# Altium PCB updated_pcb_file.PcbDoc (part 2 of 5)
Units mil, origin at the board's own origin, x right, y up, seen from the top; angles counter-clockwise.
Board outline 3385.83 x 2125.98 mil, 4 copper layers (L1 (TOP), L2 (GND), L3 (PWR), L4 (BOTTOM)), stack 38.228 mil thick; 154 components, 143 nets, 726 pads, 326 vias.
Unrouted connection lines stored in the file: 46.
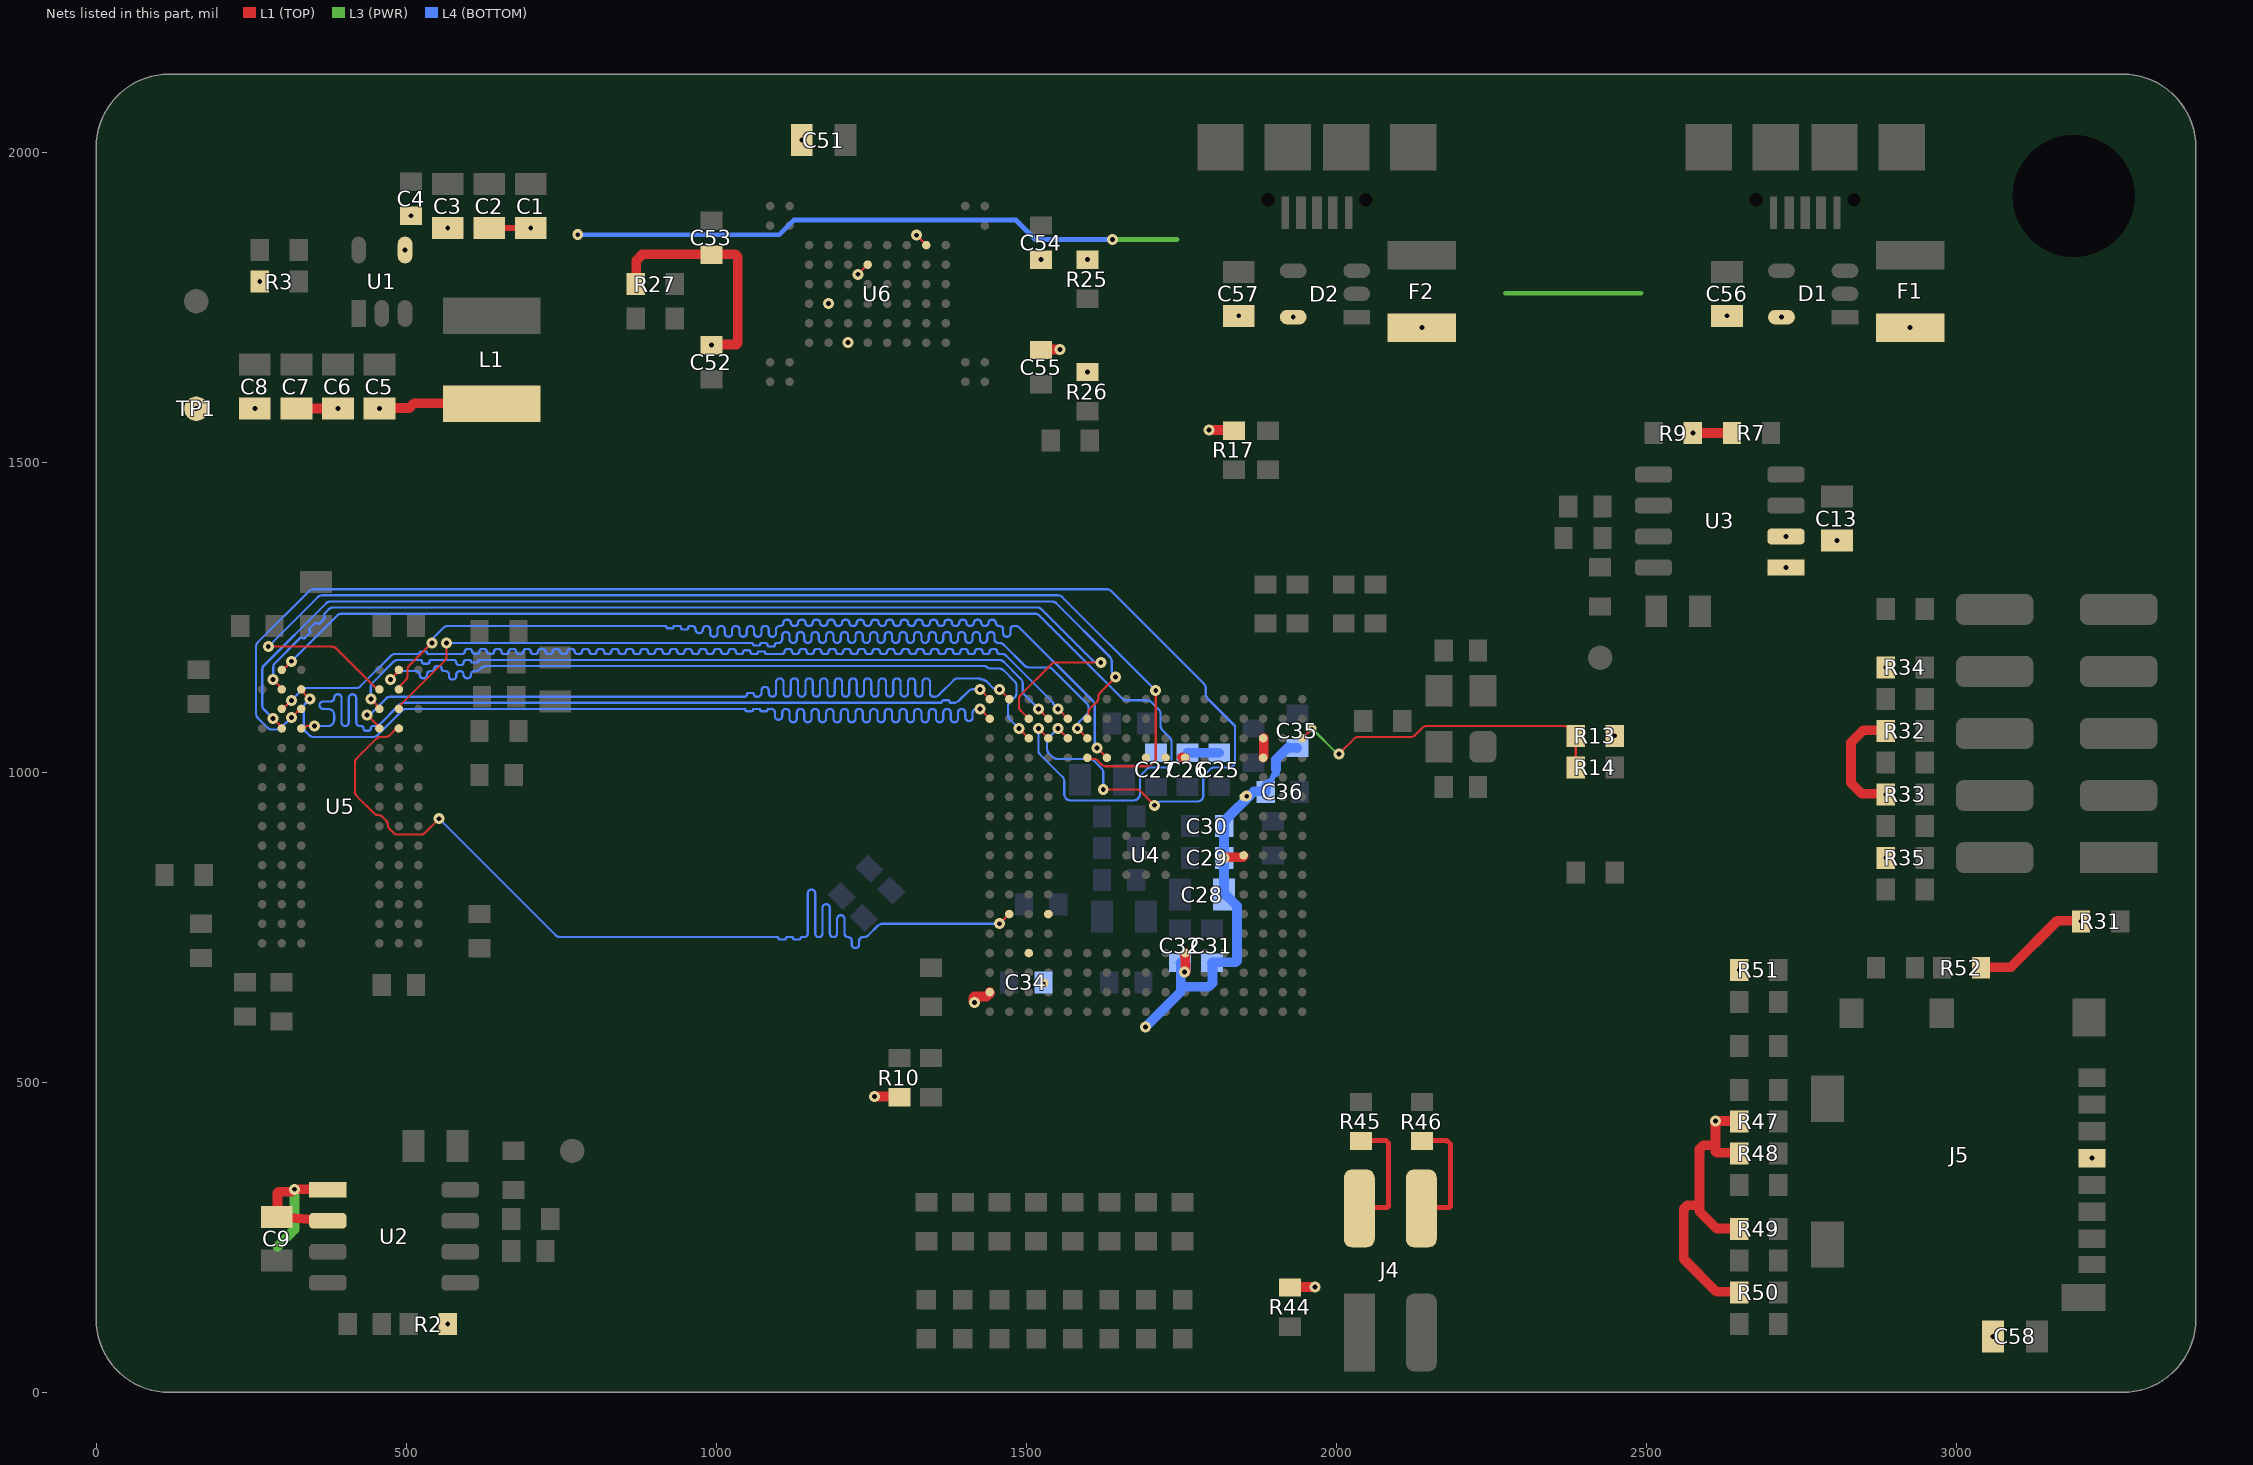
[diagram p4: the nets of this part, all layers, seen from the top]

## Via types
v1: diameter 17.72, hole 7.87, L1 (TOP) to L4 (BOTTOM), 310 vias
v2: diameter 13.78, hole 3.94, L1 (TOP) to L3 (PWR), 7 vias
v3: diameter 17.72, hole 7.87, L1 (TOP) to L3 (PWR), 5 vias
v4: diameter 13.78, hole 3.94, L2 (GND) to L4 (BOTTOM), 3 vias
v5: diameter 13.78, hole 3.94, L3 (PWR) to L4 (BOTTOM), 1 vias

## Nets (pads, with @x,y where several pads share a name; then routed paths per layer and width w, separated by ;. In a path a pad name is that pad's centre, name@x,y a point inside that pad or via, vN(x,y) a via of type N, cw(c..) or ccw(c..) an arc to the next point about the centre after c; other vN are vias at no path point) (continued)
+3V3: C5.2 C6.2 C7.2 C8.2 C9.2 C13.2 C25.2 C26.2 C27.2 C28.2 C29.2 C30.2 C31.2 C32.2 C34.2 C35.2 C36.2 C51.2 C52.2 C53.2 C54.2 C55.2 C58.2 J5.4 L1.2 R2.2 R3.1 R7.2 R9.2 R10.2 R13.2 R17.2 R25.2 R26.2 R27.2 R31.2 R32.2 R33.2 R34.2 R35.2 R44.2 R47.2 R48.2 R49.2 R50.2 R51.2 R52.2 TP1.1 U2.1 U2.2 U3.1 U3.2 U4.A2 U4.C4 U4.D6 U4.J14 U4.K14 U4.L3 U4.L4 U4.L14 U4.P9 U4.P12 U4.R14 U4.R15 U6.D3 U6.G4 U6.H8 U6.J6 | length 3043.9
  L1 (TOP) w3.54: v1(1228.35,1803.15) U6.G4@1244.09,1818.9 ; v1(1322.83,1866.14) U6.D3@1338.58,1850.39
  L1 (TOP) w11.81: U4.P9@1850.39,866.14 U4.P9@1851.42,865.02 ; U4.P12@1850.39,960.63 v1(1855.36,961.47)
  L1 (TOP) w13.14: U4.P9@1849.45,863.05 U4.P9@1851.42,865.02
  L1 (TOP) w13.78: U4.L14@1751.03,1024.46 U4.L14@1755.91,1023.62 ; U4.L3@1755.91,677.17 U4.L3@1756.93,678.01 ; U4.R15@1881.89,1055.12 U4.R15@1882.92,1055.96
  L1 (TOP) w14.47: U4.P9@1847.48,863.05 U4.P9@1849.45,863.05
  L1 (TOP) w15: U4.R14@1881.89,1023.62 U4.R14@1882.92,1026.43
  L1 (TOP) w15.24: U4.R15@1882.92,1053.99 U4.R15@1882.92,1055.96
  L1 (TOP) w15.57: U4.P9@1845.52,863.05 U4.P9@1847.48,863.05
  L1 (TOP) w15.75: C7.2@322.83,1586.61 v1(389.76,1586.61) ; U2.2@373.54,276.97 291.34,283.46 292.37,286.28 292.37,321.71 294.33,323.68 315.99,323.68 v1(319.93,327.61) 373.07,327.61 U2.1@373.54,326.97 ; v1(456.69,1586.61) 457.72,1587.46 504.96,1587.46 512.84,1595.33 636.85,1595.33 L1.2@637.8,1594.49 ; R27.2@870.08,1787.4 871.11,1790.21 871.11,1825.65 880.95,1835.49 993.15,1835.49 992.13,1834.65 995.12,1835.49 1030.56,1835.49 1034.49,1831.55 1034.49,1691.79 1032.52,1689.82 993.15,1689.82 v1(992.13,1688.98) ; v1(1254.96,477.22) 1294.33,477.22 R10.2@1295.28,476.38 ; v1(1416.38,628.8) 1414.41,630.76 1414.41,636.67 1416.38,638.64 1436.07,638.64 1441.97,644.54 U4.A2@1440.94,645.67 ; C55.2@1523.62,1681.1 1526.62,1681.94 v1(1554.18,1681.94) ; U4.L14@1751.03,1024.46 U4.L14@1755.91,1023.62 ; v1(1754.96,678.01) U4.L3@1755.91,677.17 ; U4.L4@1755.91,708.66 U4.L3@1756.93,678.01 ; v1(1794.33,1552.02) 1833.7,1552.02 R17.2@1834.65,1551.18 ; v1(1818.9,862.2) 1821.89,863.05 U4.P9@1845.52,863.05 ; U4.R14@1882.92,1026.43 U4.R15@1882.92,1053.99 ; R44.2@1925.2,169.29 1928.19,170.13 v1(1965.59,170.13) ; v1(2574.8,1547.24) R7.2@2637.8,1547.24 ; R50.2@2649.61,161.42 2648.67,162.26 2613.23,162.26 2560.08,215.41 2560.08,296.12 2565.99,302.02 2585.67,302.02 ; R49.2@2649.61,263.78 2648.67,264.62 2613.23,264.62 2585.67,292.18 2585.67,302.02 ; R48.2@2649.61,385.83 2648.67,386.67 2613.23,386.67 2611.26,388.64 2611.26,398.48 ; R47.2@2649.61,437.01 2648.67,437.85 v1(2611.26,437.85) 2611.26,398.48 ; v1(2885.83,964.57) 2886.85,965.41 2847.48,965.41 2829.77,983.13 2829.77,1048.09 2849.45,1067.77 2884.89,1067.77 R32.2@2885.83,1066.93 ; R52.2@3039.37,685.04 3042.37,685.88 3087.64,685.88 3162.44,760.69 3201.82,760.69 v1(3200.79,759.84) ; 2585.67,302.02 2585.67,392.57 2591.58,398.48 2611.26,398.48
  L3 (PWR) w15.75: 292.37,235.09 319.93,262.65 v1(319.93,327.61)
  L4 (BOTTOM) w7.87: 1894.73,987.06 1896.7,989.03 1896.7,992.97 1898.67,994.94
  L4 (BOTTOM) w9.43: C36.2@1892.76,985.09 1894.73,987.06 ; 1898.67,994.94 1900.63,996.91
  L4 (BOTTOM) w10.99: C36.2@1890.79,983.13 C36.2@1892.76,985.09 ; 1900.63,996.91 1902.6,998.87
  L4 (BOTTOM) w12.32: 1902.6,998.87 1902.6,1000.84
  L4 (BOTTOM) w12.55: C36.2@1888.82,981.16 C36.2@1890.79,983.13
  L4 (BOTTOM) w13.43: 1902.6,1000.84 1902.6,1002.81
  L4 (BOTTOM) w14.11: C36.2@1886.85,979.19 C36.2@1888.82,981.16
  L4 (BOTTOM) w14.53: 1902.6,1002.81 1902.6,1004.78
  L4 (BOTTOM) w15.44: C36.2@1886.85,977.22 C36.2@1886.85,979.19
  L4 (BOTTOM) w15.63: 1902.6,1004.78 1902.6,1006.75
  L4 (BOTTOM) w15.75: v1(1691.97,589.43) 1749.06,646.51 1749.06,691.79 C32.2@1748.03,692.91 ; 1749.06,654.39 1794.33,654.39 1800.24,660.29 1800.24,691.79 1799.21,692.91 1800.24,693.76 1837.64,693.76 1839.61,695.72 1839.61,784.31 1821.89,802.02 1818.9,803.15 1818.9,913.39 1819.93,922.1 1867.17,969.35 1884.89,969.35 1885.83,968.5 C36.2@1886.85,977.22 ; C26.2@1759.84,1031.5 C25.2@1811.02,1031.5 ; 1902.6,1006.75 1902.6,1020.53 1922.29,1040.21 C35.2@1937.01,1039.37
  other v1: 3059.06,90.55 566.93,110.24 3218.41,377.95 2649.61,681.1 2885.83,862.2 2448.82,1059.06 2885.83,1169.29 2724.88,1330.51 2807.09,1374.02 2724.88,1380.51 161.42,1586.61 255.91,1586.61 1598.43,1645.67 1212.6,1692.91 1181.1,1755.91 263.78,1791.34 1523.62,1826.77 1598.43,1826.77 1137.8,2019.69
  other v5: 1528.59,660.29
+5V_VBUS: C1.2 C2.2 C3.2 C4.2 C56.2 C57.2 D1.5 D2.5 F1.2 F2.2 U1.4 | length 1274.8
  L1 (TOP) w9.84: C2.2@633.86,1877.95 v1(700.79,1877.95)
  L3 (PWR) w7.87: v1(1638.82,1859.11) 1743.15,1859.11 ; 2272.68,1772.5 2491.19,1772.5
  L4 (BOTTOM) w7.87: v1(776.62,1866.98) 1101.42,1866.98 1125.04,1890.61 1483.31,1890.61 1514.81,1859.11 v1(1638.82,1859.11)
  other v1: 2137.8,1717.13 2925.2,1717.13 1930.32,1734.25 2717.72,1734.25 1842.52,1736.22 2629.92,1736.22 498.03,1842.52 566.93,1877.95 507.87,1897.64
CPU_BMS: R13.1 R14.2 U4.U15 | length 539.5
  L1 (TOP) w3.54: U4.U15@1944.88,1055.12 v2(1960.63,1070.87) ; v1(2003.94,1029.53) 2028.61,1054.2 cw(c2035.57,1047.24) 2035.57,1057.09 2119.94,1057.09 ccw(c2119.94,1066.93) 2126.9,1059.97 2138.85,1071.92 cw(c2145.81,1064.96) 2145.81,1074.8 2368.69,1074.8 cw(c2368.69,1071.44) 2371.06,1073.82 2372.05,1072.83 2385.83,1059.06 2385.83,1043.31 2385.83,1025.59 R14.2@2385.83,1007.87
  L3 (PWR) w3.54: v2(1960.63,1070.87) 2001.27,1030.22 ccw(c2002.95,1031.9) 2002.95,1029.53 v1(2003.94,1029.53)
DBG_UART_RX: J4.4 R46.1 | length 197.7
  L1 (TOP) w7.87: J4.4@2136.81,296.85 2138.82,298.09 2182.13,298.09 2184.1,300.06 2184.1,400.45 2178.19,406.35 2140.79,406.35 R46.1@2137.8,405.51
DBG_UART_TX: J4.2 R45.1 | length 196.4
  L1 (TOP) w7.87: J4.2@2036.81,296.85 2040.4,298.09 2081.74,298.09 2083.7,300.06 2083.7,402.42 2079.77,406.35 2042.37,406.35 R45.1@2039.37,405.51
DRAM_A0: U4.F16 U5.M8 | length 1677
  L1 (TOP) w3.54: v1(285.43,1086.61) 294.58,1077.47 cw(c292.9,1075.79) 295.27,1075.79 ccw(c297.65,1075.79) U5.M8@295.97,1074.11 ; U5.M8@295.97,1074.11 U5.M8@299.21,1070.87 ; U4.F16@1598.42,1086.61 1599.89,1091 ccw(c1590.55,1094.12) 1600.39,1094.12 1600.39,1096.46 cw(c1609.9,1096.46) 1603.18,1103.18 1613.26,1113.26 ccw(c1606.3,1120.22) 1616.14,1120.22 1616.14,1121.91 cw(c1625.98,1121.91) 1619.02,1128.87 v1(1643.7,1153.54)
  L4 (BOTTOM) w3.54: v1(285.43,1086.61) 270.6,1101.45 cw(c277.56,1108.41) 267.72,1108.41 267.72,1165.21 cw(c277.56,1165.21) 270.6,1172.17 371.13,1272.71 cw(c378.09,1265.75) 378.09,1275.59 1541.2,1275.59 cw(c1541.2,1265.75) 1548.16,1272.71 1634.91,1185.95 cw(c1627.95,1178.99) 1637.79,1178.99 1637.79,1163.53 ccw(c1647.64,1163.53) 1640.68,1156.57 v1(1643.7,1153.54)
DRAM_A1: U4.B17 U5.M3 | length 1667
  L1 (TOP) w3.54: v1(437.01,1092.52) 452.06,1077.47 cw(c450.38,1075.79) 452.76,1075.79 ccw(c455.13,1075.79) 453.45,1074.11 U5.M3@456.69,1070.87 ; v1(1456.69,1133.86) U4.B17@1472.44,1118.11
  L4 (BOTTOM) w3.54: v1(437.01,1092.52) 438.98,1092.52 ccw(c438.98,1097.27) 442.34,1093.91 467.59,1119.16 cw(c474.55,1112.2) 474.55,1122.05 1046.26,1122.05 ccw(c1046.26,1125) 1049.21,1125 cw(c1052.16,1125) 1052.16,1127.95 1058.07,1127.95 cw(c1058.07,1125) 1061.02,1125 ccw(c1063.98,1125) 1063.98,1122.05 1066.93,1122.05 ccw(c1066.93,1127.95) 1072.83,1127.95 1072.83,1131.89 cw(c1078.74,1131.89) 1078.74,1137.79 cw(c1078.74,1131.89) 1084.65,1131.89 1084.65,1127.95 ccw(c1090.55,1127.95) 1090.55,1122.05 ccw(c1090.55,1127.95) 1096.46,1127.95 1096.46,1145.67 cw(c1102.36,1145.67) 1102.36,1151.57 cw(c1102.36,1145.67) 1108.27,1145.67 1108.27,1127.95 ccw(c1114.17,1127.95) 1114.17,1122.05 ccw(c1114.17,1127.95) 1120.08,1127.95 1120.08,1145.67 cw(c1125.98,1145.67) 1125.98,1151.57 cw(c1125.98,1145.67) 1131.89,1145.67 1131.89,1127.95 ccw(c1137.79,1127.95) 1137.79,1122.05 ccw(c1137.79,1127.95) 1143.7,1127.95 1143.7,1145.67 cw(c1149.61,1145.67) 1149.61,1151.57 cw(c1149.61,1145.67) 1155.51,1145.67 1155.51,1127.95 ccw(c1161.42,1127.95) 1161.42,1122.05 ccw(c1161.42,1127.95) 1167.32,1127.95 1167.32,1145.67 cw(c1173.23,1145.67) 1173.23,1151.57 cw(c1173.23,1145.67) 1179.13,1145.67 1179.13,1127.95 ccw(c1185.04,1127.95) 1185.04,1122.05 ccw(c1185.04,1127.95) 1190.94,1127.95 1190.94,1145.67 cw(c1196.85,1145.67) 1196.85,1151.57 cw(c1196.85,1145.67) 1202.76,1145.67 1202.76,1127.95 ccw(c1208.66,1127.95) 1208.66,1122.05 ccw(c1208.66,1127.95) 1214.57,1127.95 1214.57,1145.67 cw(c1220.47,1145.67) 1220.47,1151.57 cw(c1220.47,1145.67) 1226.38,1145.67 1226.38,1127.95 ccw(c1232.28,1127.95) 1232.28,1122.05 ccw(c1232.28,1127.95) 1238.19,1127.95 1238.19,1145.67 cw(c1244.09,1145.67) 1244.09,1151.57 cw(c1244.09,1145.67) 1250,1145.67 1250,1127.95 ccw(c1255.9,1127.95) 1255.9,1122.05 ccw(c1255.9,1127.95) 1261.81,1127.95 1261.81,1145.67 cw(c1267.72,1145.67) 1267.72,1151.57 cw(c1267.72,1145.67) 1273.62,1145.67 1273.62,1127.95 ccw(c1279.53,1127.95) 1279.53,1122.05 ccw(c1279.53,1127.95) 1285.43,1127.95 1285.43,1145.67 cw(c1291.34,1145.67) 1291.34,1151.57 cw(c1291.34,1145.67) 1297.24,1145.67 1297.24,1127.95 ccw(c1303.15,1127.95) 1303.15,1122.05 ccw(c1303.15,1127.95) 1309.05,1127.95 1309.05,1145.67 cw(c1314.96,1145.67) 1314.96,1151.57 cw(c1314.96,1145.67) 1320.87,1145.67 1320.87,1127.95 ccw(c1326.77,1127.95) 1326.77,1122.05 ; 1326.77,1122.05 ccw(c1326.77,1127.95) 1332.68,1127.95 1332.68,1145.67 cw(c1338.58,1145.67) 1338.58,1151.57 cw(c1338.58,1145.67) 1344.49,1145.67 1344.49,1127.95 ccw(c1350.39,1127.95) 1350.39,1122.05 1352.22,1122.05 ccw(c1352.22,1131.89) 1359.18,1124.93 1382.94,1148.69 cw(c1389.9,1141.73) 1389.9,1151.57 1423.8,1151.57 cw(c1423.8,1148.21) 1426.18,1150.59 ccw(c1428.56,1152.97) 1428.56,1149.61 1429.71,1149.61 cw(c1429.71,1146.25) 1432.09,1148.62 1432.37,1148.33 ccw(c1434.05,1150.01) 1434.05,1147.64 cw(c1434.05,1145.26) 1435.73,1146.94 1446.03,1136.64 ccw(c1452.76,1143.36) 1452.76,1133.86 v1(1456.69,1133.86)
DRAM_A2: U4.A17 U5.M7 | length 1372.1
  L1 (TOP) w3.54: U5.M7@330.71,1070.87 335.29,1072.39 ccw(c333.43,1077.99) 337.6,1073.82 cw(c339.97,1071.44) 339.97,1074.8 v1(352.36,1074.8) ; v1(1425.2,1133.86) U4.A17@1440.94,1118.11
  L4 (BOTTOM) w3.54: v1(352.36,1074.8) 374.02,1074.8 ccw(c374.02,1084.65) 383.86,1084.65 383.86,1092.52 ccw(c374.02,1092.52) 374.02,1102.36 366.14,1102.36 cw(c366.14,1108.27) 360.24,1108.27 cw(c366.14,1108.27) 366.14,1114.17 377.95,1114.17 ccw(c377.95,1120.08) 383.86,1120.08 cw(c389.76,1120.08) 389.76,1125.98 cw(c389.76,1120.08) 395.67,1120.08 395.67,1080.71 ccw(c401.57,1080.71) 401.57,1074.8 ccw(c401.57,1080.71) 407.48,1080.71 407.48,1120.08 cw(c413.39,1120.08) 413.39,1125.98 cw(c413.39,1120.08) 419.29,1120.08 419.29,1080.71 ccw(c425.2,1080.71) 425.2,1074.8 427.16,1074.8 cw(c427.16,1070.87) 431.1,1070.87 ccw(c435.04,1070.87) 435.04,1066.93 438.98,1066.93 ccw(c438.98,1070.87) 442.91,1070.87 cw(c446.85,1070.87) 446.85,1074.8 450.65,1074.8 ccw(c450.65,1084.65) 457.61,1077.69 489.24,1109.32 cw(c496.2,1102.36) 496.2,1112.2 1362.2,1112.2 ccw(c1362.2,1114.17) 1364.17,1114.17 cw(c1366.14,1114.17) 1366.14,1116.14 1374.02,1116.14 cw(c1374.02,1114.17) 1375.98,1114.17 ccw(c1377.95,1114.17) 1377.95,1112.2 1383.72,1112.2 ccw(c1383.72,1122.05) 1390.68,1115.09 1406.57,1130.98 cw(c1413.53,1124.02) 1413.53,1133.86 v1(1425.2,1133.86)
DRAM_A3: U4.F15 U5.N2 | length 1669.2
  L1 (TOP) w3.54: U5.N2@488.19,1102.36 489.42,1106.06 cw(c498.76,1102.95) 491.8,1109.91 562.08,1180.19 ccw(c555.12,1187.15) 564.96,1187.15 v1(564.96,1208.66) ; v1(1582.68,1070.87) U4.F15@1598.42,1055.12
  L4 (BOTTOM) w3.54: v1(564.96,1208.66) 1057.09,1208.66 cw(c1057.09,1206.69) 1059.05,1206.69 ccw(c1061.02,1206.69) 1061.02,1204.72 1068.9,1204.72 ccw(c1068.9,1206.69) 1070.87,1206.69 cw(c1072.83,1206.69) 1072.83,1208.66 1079.72,1208.66 cw(c1079.72,1205.71) 1082.68,1205.71 ccw(c1085.63,1205.71) 1085.63,1202.76 1091.53,1202.76 ccw(c1091.53,1205.71) 1094.49,1205.71 cw(c1097.44,1205.71) 1097.44,1208.66 1100.39,1208.66 ccw(c1100.39,1214.57) 1106.3,1214.57 1106.3,1220.47 cw(c1112.2,1220.47) 1112.2,1226.38 cw(c1112.2,1220.47) 1118.11,1220.47 1118.11,1214.57 ccw(c1124.02,1214.57) 1124.02,1208.66 ccw(c1124.02,1214.57) 1129.92,1214.57 1129.92,1220.47 cw(c1135.83,1220.47) 1135.83,1226.38 cw(c1135.83,1220.47) 1141.73,1220.47 1141.73,1214.57 ccw(c1147.64,1214.57) 1147.64,1208.66 ccw(c1147.64,1214.57) 1153.54,1214.57 1153.54,1220.47 cw(c1159.45,1220.47) 1159.45,1226.38 cw(c1159.45,1220.47) 1165.35,1220.47 1165.35,1214.57 ccw(c1171.26,1214.57) 1171.26,1208.66 ccw(c1171.26,1214.57) 1177.16,1214.57 1177.16,1220.47 cw(c1183.07,1220.47) 1183.07,1226.38 cw(c1183.07,1220.47) 1188.98,1220.47 1188.98,1214.57 ccw(c1194.88,1214.57) 1194.88,1208.66 ccw(c1194.88,1214.57) 1200.79,1214.57 1200.79,1220.47 cw(c1206.69,1220.47) 1206.69,1226.38 cw(c1206.69,1220.47) 1212.6,1220.47 1212.6,1214.57 ccw(c1218.5,1214.57) 1218.5,1208.66 ccw(c1218.5,1214.57) 1224.41,1214.57 1224.41,1220.47 cw(c1230.31,1220.47) 1230.31,1226.38 cw(c1230.31,1220.47) 1236.22,1220.47 1236.22,1214.57 ccw(c1242.13,1214.57) 1242.13,1208.66 ccw(c1242.13,1214.57) 1248.03,1214.57 1248.03,1220.47 cw(c1253.94,1220.47) 1253.94,1226.38 cw(c1253.94,1220.47) 1259.84,1220.47 1259.84,1214.57 ccw(c1265.75,1214.57) 1265.75,1208.66 ccw(c1265.75,1214.57) 1271.65,1214.57 1271.65,1220.47 cw(c1277.56,1220.47) 1277.56,1226.38 cw(c1277.56,1220.47) 1283.46,1220.47 1283.46,1214.57 ccw(c1289.37,1214.57) 1289.37,1208.66 ccw(c1289.37,1214.57) 1295.27,1214.57 1295.27,1220.47 cw(c1301.18,1220.47) 1301.18,1226.38 cw(c1301.18,1220.47) 1307.09,1220.47 1307.09,1214.57 ccw(c1312.99,1214.57) 1312.99,1208.66 ccw(c1312.99,1214.57) 1318.9,1214.57 1318.9,1220.47 cw(c1324.8,1220.47) 1324.8,1226.38 cw(c1324.8,1220.47) 1330.71,1220.47 1330.71,1214.57 ccw(c1336.61,1214.57) 1336.61,1208.66 ccw(c1336.61,1214.57) 1342.52,1214.57 1342.52,1220.47 cw(c1348.42,1220.47) 1348.42,1226.38 cw(c1348.42,1220.47) 1354.33,1220.47 1354.33,1214.57 ccw(c1360.24,1214.57) 1360.24,1208.66 ccw(c1360.24,1214.57) 1366.14,1214.57 1366.14,1220.47 cw(c1372.05,1220.47) 1372.05,1226.38 cw(c1372.05,1220.47) 1377.95,1220.47 1377.95,1214.57 ccw(c1383.86,1214.57) 1383.86,1208.66 ccw(c1383.86,1214.57) 1389.76,1214.57 1389.76,1220.47 cw(c1395.67,1220.47) 1395.67,1226.38 cw(c1395.67,1220.47) 1401.57,1220.47 1401.57,1214.57 ccw(c1407.48,1214.57) 1407.48,1208.66 ccw(c1407.48,1214.57) 1413.39,1214.57 1413.39,1220.47 cw(c1419.29,1220.47) 1419.29,1226.38 cw(c1419.29,1220.47) 1425.2,1220.47 1425.2,1214.57 ccw(c1431.1,1214.57) 1431.1,1208.66 ccw(c1431.1,1214.57) 1437.01,1214.57 1437.01,1220.47 cw(c1442.91,1220.47) 1442.91,1226.38 cw(c1442.91,1220.47) 1448.82,1220.47 1448.82,1214.57 ccw(c1454.72,1214.57) 1454.72,1208.66 1456.55,1208.66 cw(c1456.55,1198.82) 1463.51,1205.78 1497.12,1172.17 ccw(c1504.08,1179.13) 1504.08,1169.29 1535.29,1169.29 cw(c1535.29,1159.45) 1542.25,1166.41 1597.51,1111.15 cw(c1590.55,1104.19) 1600.39,1104.19 1600.39,1100.53 cw(c1590.55,1100.53) 1597.51,1093.57 1585.46,1081.52 ccw(c1592.18,1074.8) 1582.68,1074.8 v1(1582.68,1070.87)
DRAM_A4: U4.E16 U5.N8 | length 1668
  L1 (TOP) w3.54: U5.N8@299.21,1102.36 302.45,1105.6 cw(c304.13,1103.92) 304.13,1106.3 ccw(c304.13,1108.67) 305.81,1106.99 v1(314.96,1116.14) ; v1(1551.18,1102.36) U4.E16@1566.93,1086.61
  L4 (BOTTOM) w3.54: v1(314.96,1116.14) 331.76,1132.94 cw(c338.72,1125.98) 338.72,1135.83 419.15,1135.83 ccw(c419.15,1145.67) 426.11,1138.71 475.46,1188.06 cw(c482.42,1181.1) 482.42,1190.94 519.68,1190.94 ccw(c519.68,1192.91) 521.65,1192.91 cw(c523.62,1192.91) 523.62,1194.88 531.5,1194.88 cw(c531.5,1192.91) 533.46,1192.91 ccw(c535.43,1192.91) 535.43,1190.94 590.55,1190.94 ccw(c590.55,1194.88) 594.49,1194.88 cw(c598.42,1194.88) 598.42,1198.82 602.36,1198.82 cw(c602.36,1194.88) 606.3,1194.88 ccw(c610.24,1194.88) 610.24,1190.94 614.17,1190.94 ccw(c614.17,1194.88) 618.11,1194.88 cw(c622.05,1194.88) 622.05,1198.82 625.98,1198.82 cw(c625.98,1194.88) 629.92,1194.88 ccw(c633.86,1194.88) 633.86,1190.94 637.79,1190.94 ccw(c637.79,1194.88) 641.73,1194.88 cw(c645.67,1194.88) 645.67,1198.82 649.61,1198.82 cw(c649.61,1194.88) 653.54,1194.88 ccw(c657.48,1194.88) 657.48,1190.94 661.42,1190.94 ccw(c661.42,1194.88) 665.35,1194.88 cw(c669.29,1194.88) 669.29,1198.82 673.23,1198.82 cw(c673.23,1194.88) 677.16,1194.88 ccw(c681.1,1194.88) 681.1,1190.94 685.04,1190.94 ccw(c685.04,1194.88) 688.98,1194.88 cw(c692.91,1194.88) 692.91,1198.82 696.85,1198.82 cw(c696.85,1194.88) 700.79,1194.88 ccw(c704.72,1194.88) 704.72,1190.94 708.66,1190.94 ccw(c708.66,1194.88) 712.6,1194.88 cw(c716.53,1194.88) 716.53,1198.82 720.47,1198.82 cw(c720.47,1194.88) 724.41,1194.88 ccw(c728.35,1194.88) 728.35,1190.94 732.28,1190.94 ccw(c732.28,1194.88) 736.22,1194.88 cw(c740.16,1194.88) 740.16,1198.82 744.09,1198.82 cw(c744.09,1194.88) 748.03,1194.88 ccw(c751.97,1194.88) 751.97,1190.94 755.9,1190.94 ccw(c755.9,1194.88) 759.84,1194.88 cw(c763.78,1194.88) 763.78,1198.82 767.72,1198.82 cw(c767.72,1194.88) 771.65,1194.88 ccw(c775.59,1194.88) 775.59,1190.94 779.53,1190.94 ccw(c779.53,1194.88) 783.46,1194.88 cw(c787.4,1194.88) 787.4,1198.82 791.34,1198.82 cw(c791.34,1194.88) 795.27,1194.88 ccw(c799.21,1194.88) 799.21,1190.94 803.15,1190.94 ccw(c803.15,1194.88) 807.09,1194.88 cw(c811.02,1194.88) 811.02,1198.82 814.96,1198.82 cw(c814.96,1194.88) 818.9,1194.88 ccw(c822.83,1194.88) 822.83,1190.94 826.77,1190.94 ; 826.77,1190.94 ccw(c826.77,1194.88) 830.71,1194.88 cw(c834.65,1194.88) 834.65,1198.82 838.58,1198.82 cw(c838.58,1194.88) 842.52,1194.88 ccw(c846.46,1194.88) 846.46,1190.94 850.39,1190.94 ccw(c850.39,1194.88) 854.33,1194.88 cw(c858.27,1194.88) 858.27,1198.82 862.2,1198.82 cw(c862.2,1194.88) 866.14,1194.88 ccw(c870.08,1194.88) 870.08,1190.94 874.02,1190.94 ccw(c874.02,1194.88) 877.95,1194.88 cw(c881.89,1194.88) 881.89,1198.82 885.83,1198.82 cw(c885.83,1194.88) 889.76,1194.88 ccw(c893.7,1194.88) 893.7,1190.94 897.64,1190.94 ccw(c897.64,1194.88) 901.57,1194.88 cw(c905.51,1194.88) 905.51,1198.82 909.45,1198.82 cw(c909.45,1194.88) 913.39,1194.88 ccw(c917.32,1194.88) 917.32,1190.94 921.26,1190.94 ccw(c921.26,1194.88) 925.2,1194.88 cw(c929.13,1194.88) 929.13,1198.82 933.07,1198.82 cw(c933.07,1194.88) 937.01,1194.88 ccw(c940.94,1194.88) 940.94,1190.94 944.88,1190.94 ccw(c944.88,1194.88) 948.82,1194.88 cw(c952.76,1194.88) 952.76,1198.82 956.69,1198.82 cw(c956.69,1194.88) 960.63,1194.88 ccw(c964.57,1194.88) 964.57,1190.94 968.5,1190.94 ccw(c968.5,1194.88) 972.44,1194.88 cw(c976.38,1194.88) 976.38,1198.82 980.31,1198.82 cw(c980.31,1194.88) 984.25,1194.88 ccw(c988.19,1194.88) 988.19,1190.94 992.13,1190.94 ccw(c992.13,1194.88) 996.06,1194.88 cw(c1000,1194.88) 1000,1198.82 1003.94,1198.82 cw(c1003.94,1194.88) 1007.87,1194.88 ccw(c1011.81,1194.88) 1011.81,1190.94 1015.75,1190.94 ccw(c1015.75,1194.88) 1019.68,1194.88 cw(c1023.62,1194.88) 1023.62,1198.82 1027.56,1198.82 cw(c1027.56,1194.88) 1031.5,1194.88 ccw(c1035.43,1194.88) 1035.43,1190.94 1040.35,1190.94 ccw(c1040.35,1193.9) 1043.31,1193.9 cw(c1046.26,1193.9) 1046.26,1196.85 1052.16,1196.85 cw(c1052.16,1193.9) 1055.12,1193.9 ccw(c1058.07,1193.9) 1058.07,1190.94 1064.96,1190.94 ccw(c1064.96,1192.91) 1066.93,1192.91 cw(c1068.9,1192.91) 1068.9,1194.88 1076.77,1194.88 ; 1076.77,1194.88 cw(c1076.77,1192.91) 1078.74,1192.91 ccw(c1080.71,1192.91) 1080.71,1190.94 1106.3,1190.94 ccw(c1106.3,1194.88) 1110.24,1194.88 cw(c1114.17,1194.88) 1114.17,1198.82 1118.11,1198.82 cw(c1118.11,1194.88) 1122.05,1194.88 ccw(c1125.98,1194.88) 1125.98,1190.94 1129.92,1190.94 ccw(c1129.92,1194.88) 1133.86,1194.88 cw(c1137.79,1194.88) 1137.79,1198.82 1141.73,1198.82 cw(c1141.73,1194.88) 1145.67,1194.88 ccw(c1149.61,1194.88) 1149.61,1190.94 1153.54,1190.94 ccw(c1153.54,1194.88) 1157.48,1194.88 cw(c1161.42,1194.88) 1161.42,1198.82 1165.35,1198.82 cw(c1165.35,1194.88) 1169.29,1194.88 ccw(c1173.23,1194.88) 1173.23,1190.94 1177.16,1190.94 ccw(c1177.16,1194.88) 1181.1,1194.88 cw(c1185.04,1194.88) 1185.04,1198.82 1188.98,1198.82 cw(c1188.98,1194.88) 1192.91,1194.88 ccw(c1196.85,1194.88) 1196.85,1190.94 1200.79,1190.94 ccw(c1200.79,1194.88) 1204.72,1194.88 cw(c1208.66,1194.88) 1208.66,1198.82 1212.6,1198.82 cw(c1212.6,1194.88) 1216.53,1194.88 ccw(c1220.47,1194.88) 1220.47,1190.94 1224.41,1190.94 ccw(c1224.41,1194.88) 1228.35,1194.88 cw(c1232.28,1194.88) 1232.28,1198.82 1236.22,1198.82 cw(c1236.22,1194.88) 1240.16,1194.88 ccw(c1244.09,1194.88) 1244.09,1190.94 1248.03,1190.94 ccw(c1248.03,1194.88) 1251.97,1194.88 cw(c1255.9,1194.88) 1255.9,1198.82 1259.84,1198.82 cw(c1259.84,1194.88) 1263.78,1194.88 ccw(c1267.72,1194.88) 1267.72,1190.94 1271.65,1190.94 ccw(c1271.65,1194.88) 1275.59,1194.88 cw(c1279.53,1194.88) 1279.53,1198.82 1283.46,1198.82 cw(c1283.46,1194.88) 1287.4,1194.88 ccw(c1291.34,1194.88) 1291.34,1190.94 1295.27,1190.94 ccw(c1295.27,1194.88) 1299.21,1194.88 cw(c1303.15,1194.88) 1303.15,1198.82 1307.09,1198.82 cw(c1307.09,1194.88) 1311.02,1194.88 ccw(c1314.96,1194.88) 1314.96,1190.94 1318.9,1190.94 ccw(c1318.9,1194.88) 1322.83,1194.88 cw(c1326.77,1194.88) 1326.77,1198.82 ; 1326.77,1198.82 1330.71,1198.82 cw(c1330.71,1194.88) 1334.65,1194.88 ccw(c1338.58,1194.88) 1338.58,1190.94 1342.52,1190.94 ccw(c1342.52,1194.88) 1346.46,1194.88 cw(c1350.39,1194.88) 1350.39,1198.82 1354.33,1198.82 cw(c1354.33,1194.88) 1358.27,1194.88 ccw(c1362.2,1194.88) 1362.2,1190.94 1366.14,1190.94 ccw(c1366.14,1194.88) 1370.08,1194.88 cw(c1374.02,1194.88) 1374.02,1198.82 1377.95,1198.82 cw(c1377.95,1194.88) 1381.89,1194.88 ccw(c1385.83,1194.88) 1385.83,1190.94 1389.76,1190.94 ccw(c1389.76,1194.88) 1393.7,1194.88 cw(c1397.64,1194.88) 1397.64,1198.82 1401.57,1198.82 cw(c1401.57,1194.88) 1405.51,1194.88 ccw(c1409.45,1194.88) 1409.45,1190.94 1413.39,1190.94 ccw(c1413.39,1194.88) 1417.32,1194.88 cw(c1421.26,1194.88) 1421.26,1198.82 1425.2,1198.82 cw(c1425.2,1194.88) 1429.13,1194.88 ccw(c1433.07,1194.88) 1433.07,1190.94 1437.01,1190.94 ccw(c1437.01,1194.88) 1440.94,1194.88 cw(c1444.88,1194.88) 1444.88,1198.82 1448.82,1198.82 cw(c1448.82,1194.88) 1452.76,1194.88 ccw(c1456.69,1194.88) 1456.69,1190.94 1460.49,1190.94 cw(c1460.49,1181.1) 1467.45,1188.06 1542.61,1112.9 cw(c1540.93,1111.22) 1543.31,1111.22 ccw(c1545.68,1111.22) 1544,1109.54 v1(1551.18,1102.36)
DRAM_A5: U4.D16 U5.N3 | length 1222.5
  L1 (TOP) w3.54: v1(442.91,1118.11) 452.06,1108.96 cw(c450.38,1107.28) 452.76,1107.28 ccw(c455.13,1107.28) 453.45,1105.6 U5.N3@456.69,1102.36 ; v1(1519.68,1102.36) U4.D16@1535.43,1086.61
  L4 (BOTTOM) w3.54: v1(442.91,1118.11) 442.91,1137.66 cw(c452.76,1137.66) 445.8,1144.61 479.4,1178.22 cw(c486.36,1171.26) 486.36,1181.1 522.64,1181.1 cw(c522.64,1178.15) 525.59,1178.15 ccw(c528.54,1178.15) 528.54,1175.2 534.45,1175.2 ccw(c534.45,1178.15) 537.4,1178.15 cw(c540.35,1178.15) 540.35,1181.1 576.77,1181.1 ; 576.77,1181.1 cw(c576.77,1177.17) 580.71,1177.17 ccw(c584.65,1177.17) 584.65,1173.23 588.58,1173.23 ccw(c588.58,1177.17) 592.52,1177.17 cw(c596.46,1177.17) 596.46,1181.1 602.36,1181.1 cw(c602.36,1179.13) 604.33,1179.13 ccw(c606.3,1179.13) 606.3,1177.17 614.17,1177.17 ccw(c614.17,1179.13) 616.14,1179.13 cw(c618.11,1179.13) 618.11,1181.1 1456.55,1181.1 cw(c1456.55,1171.26) 1463.51,1178.22 1491.21,1150.52 cw(c1484.25,1143.56) 1494.09,1143.56 1494.09,1132.03 ccw(c1503.94,1132.03) 1496.98,1125.07 v1(1519.68,1102.36)
DRAM_A6: U4.E15 U5.N7 | length 2453.8
  L1 (TOP) w3.54: v1(314.96,1088.58) 324.11,1097.73 cw(c325.79,1096.05) 325.79,1098.42 ccw(c325.79,1100.8) 327.47,1099.12 U5.N7@330.71,1102.36 ; v1(1551.18,1070.87) U4.E15@1566.93,1055.12 ; v1(1624.02,972.44) 1677.02,972.44 cw(c1677.02,962.6) 1683.98,969.56 v1(1706.69,946.85)
  L4 (BOTTOM) w3.54: v1(314.96,1088.58) 298.16,1071.78 cw(c291.2,1078.74) 291.2,1068.9 283.6,1068.9 cw(c283.6,1078.74) 276.64,1071.78 260.76,1087.67 cw(c267.72,1094.63) 257.87,1094.63 257.87,1202.62 cw(c267.72,1202.62) 260.76,1209.58 343.57,1292.39 cw(c350.53,1285.43) 350.53,1295.28 1629.78,1295.28 cw(c1629.78,1285.43) 1636.74,1292.39 1786.49,1142.65 cw(c1779.53,1135.69) 1789.37,1135.69 1789.37,1126.12 ccw(c1799.21,1126.12) 1792.25,1119.16 1836.61,1074.8 1836.61,1017.86 cw(c1826.77,1017.86) 1833.73,1010.9 1833.59,1010.76 cw(c1826.63,1017.72) 1826.63,1007.87 1803.29,1007.87 ccw(c1803.29,998.03) 1796.33,1004.99 1788.32,996.98 ccw(c1795.27,990.02) 1785.43,990.02 1785.43,962.74 cw(c1775.59,962.74) 1782.55,955.78 1782.41,955.64 cw(c1775.45,962.6) 1775.45,952.76 1716.67,952.76 ccw(c1716.67,942.91) 1709.71,949.87 v1(1706.69,946.85) ; v1(1551.18,1070.87) 1536.35,1056.03 ccw(c1543.31,1049.07) 1533.46,1049.07 1533.46,1037.54 ccw(c1543.31,1037.54) 1536.35,1030.58 1542.39,1024.54 ccw(c1549.35,1031.5) 1549.35,1021.65 1602.22,1021.65 cw(c1602.22,1011.81) 1609.18,1018.77 1621.13,1006.82 cw(c1614.17,999.86) 1624.02,999.86 v1(1624.02,972.44)
DRAM_A7: U4.G14 U5.P2 | length 1670.4
  L1 (TOP) w3.54: U5.P2@488.19,1133.86 489.42,1137.56 cw(c498.76,1134.45) 491.8,1141.41 499.09,1148.69 ccw(c492.13,1155.65) 501.97,1155.65 501.97,1165.21 cw(c511.81,1165.21) 504.85,1172.17 v1(541.34,1208.66) ; v1(1614.17,1039.37) U4.G14@1629.92,1023.62
  L4 (BOTTOM) w3.54: v1(541.34,1208.66) 541.34,1211.61 cw(c548.47,1211.61) 543.43,1216.65 560.11,1233.34 cw(c567.07,1226.38) 567.07,1236.22 917.32,1236.22 cw(c917.32,1234.25) 919.29,1234.25 ccw(c921.26,1234.25) 921.26,1232.28 929.13,1232.28 ccw(c929.13,1234.25) 931.1,1234.25 cw(c933.07,1234.25) 933.07,1236.22 939.96,1236.22 cw(c939.96,1233.27) 942.91,1233.27 ccw(c945.87,1233.27) 945.87,1230.31 951.77,1230.31 ccw(c951.77,1233.27) 954.72,1233.27 cw(c957.68,1233.27) 957.68,1236.22 960.63,1236.22 cw(c960.63,1230.31) 966.53,1230.31 ccw(c972.44,1230.31) 972.44,1224.41 ccw(c972.44,1230.31) 978.35,1230.31 cw(c984.25,1230.31) 984.25,1236.22 cw(c984.25,1230.31) 990.16,1230.31 990.16,1224.41 ccw(c996.06,1224.41) 996.06,1218.5 ccw(c996.06,1224.41) 1001.97,1224.41 1001.97,1230.31 cw(c1007.87,1230.31) 1007.87,1236.22 cw(c1007.87,1230.31) 1013.78,1230.31 1013.78,1224.41 ccw(c1019.68,1224.41) 1019.68,1218.5 ccw(c1019.68,1224.41) 1025.59,1224.41 1025.59,1230.31 cw(c1031.5,1230.31) 1031.5,1236.22 cw(c1031.5,1230.31) 1037.4,1230.31 1037.4,1224.41 ccw(c1043.31,1224.41) 1043.31,1218.5 ccw(c1043.31,1224.41) 1049.21,1224.41 1049.21,1230.31 cw(c1055.12,1230.31) 1055.12,1236.22 cw(c1055.12,1230.31) 1061.02,1230.31 1061.02,1224.41 ccw(c1066.93,1224.41) 1066.93,1218.5 ccw(c1066.93,1224.41) 1072.83,1224.41 1072.83,1230.31 cw(c1078.74,1230.31) 1078.74,1236.22 cw(c1078.74,1230.31) 1084.65,1230.31 1084.65,1224.41 ccw(c1090.55,1224.41) 1090.55,1218.5 ccw(c1090.55,1224.41) 1096.46,1224.41 1096.46,1230.31 cw(c1102.36,1230.31) 1102.36,1236.22 1103.35,1236.22 ccw(c1103.35,1241.14) 1108.27,1241.14 cw(c1113.19,1241.14) 1113.19,1246.06 1115.16,1246.06 cw(c1115.16,1241.14) 1120.08,1241.14 ccw(c1125,1241.14) 1125,1236.22 1126.97,1236.22 ccw(c1126.97,1241.14) 1131.89,1241.14 cw(c1136.81,1241.14) 1136.81,1246.06 1138.78,1246.06 cw(c1138.78,1241.14) 1143.7,1241.14 ccw(c1148.62,1241.14) 1148.62,1236.22 1150.59,1236.22 ccw(c1150.59,1241.14) 1155.51,1241.14 cw(c1160.43,1241.14) 1160.43,1246.06 1162.4,1246.06 cw(c1162.4,1241.14) 1167.32,1241.14 ccw(c1172.24,1241.14) 1172.24,1236.22 1174.21,1236.22 ccw(c1174.21,1241.14) 1179.13,1241.14 cw(c1184.05,1241.14) 1184.05,1246.06 1186.02,1246.06 cw(c1186.02,1241.14) 1190.94,1241.14 ccw(c1195.87,1241.14) 1195.87,1236.22 1197.83,1236.22 ccw(c1197.83,1241.14) 1202.76,1241.14 cw(c1207.68,1241.14) 1207.68,1246.06 1209.65,1246.06 cw(c1209.65,1241.14) 1214.57,1241.14 ccw(c1219.49,1241.14) 1219.49,1236.22 1221.46,1236.22 ccw(c1221.46,1241.14) 1226.38,1241.14 cw(c1231.3,1241.14) 1231.3,1246.06 1233.27,1246.06 cw(c1233.27,1241.14) 1238.19,1241.14 ccw(c1243.11,1241.14) 1243.11,1236.22 1245.08,1236.22 ccw(c1245.08,1241.14) 1250,1241.14 cw(c1254.92,1241.14) 1254.92,1246.06 1256.89,1246.06 cw(c1256.89,1241.14) 1261.81,1241.14 ccw(c1266.73,1241.14) 1266.73,1236.22 1268.7,1236.22 ccw(c1268.7,1241.14) 1273.62,1241.14 cw(c1278.54,1241.14) 1278.54,1246.06 1280.51,1246.06 cw(c1280.51,1241.14) 1285.43,1241.14 ccw(c1290.35,1241.14) 1290.35,1236.22 1292.32,1236.22 ccw(c1292.32,1241.14) 1297.24,1241.14 cw(c1302.16,1241.14) 1302.16,1246.06 1304.13,1246.06 cw(c1304.13,1241.14) 1309.05,1241.14 ccw(c1313.98,1241.14) 1313.98,1236.22 1315.94,1236.22 ccw(c1315.94,1241.14) 1320.87,1241.14 cw(c1325.79,1241.14) 1325.79,1246.06 1327.76,1246.06 cw(c1327.76,1241.14) 1332.68,1241.14 ccw(c1337.6,1241.14) 1337.6,1236.22 1339.57,1236.22 ccw(c1339.57,1241.14) 1344.49,1241.14 cw(c1349.41,1241.14) 1349.41,1246.06 1351.38,1246.06 cw(c1351.38,1241.14) 1356.3,1241.14 ccw(c1361.22,1241.14) 1361.22,1236.22 1363.19,1236.22 ccw(c1363.19,1241.14) 1368.11,1241.14 cw(c1373.03,1241.14) 1373.03,1246.06 1375,1246.06 cw(c1375,1241.14) 1379.92,1241.14 ccw(c1384.84,1241.14) 1384.84,1236.22 1386.81,1236.22 ccw(c1386.81,1241.14) 1391.73,1241.14 cw(c1396.65,1241.14) 1396.65,1246.06 1398.62,1246.06 cw(c1398.62,1241.14) 1403.54,1241.14 ccw(c1408.46,1241.14) 1408.46,1236.22 1410.43,1236.22 ccw(c1410.43,1241.14) 1415.35,1241.14 cw(c1420.27,1241.14) 1420.27,1246.06 1422.24,1246.06 cw(c1422.24,1241.14) 1427.16,1241.14 ccw(c1432.09,1241.14) 1432.09,1236.22 1434.05,1236.22 ccw(c1434.05,1241.14) 1438.98,1241.14 cw(c1443.9,1241.14) 1443.9,1246.06 1445.87,1246.06 cw(c1445.87,1241.14) 1450.79,1241.14 ccw(c1455.71,1241.14) 1455.71,1236.22 1456.69,1236.22 cw(c1456.69,1230.31) 1462.6,1230.31 1462.6,1224.41 ccw(c1468.5,1224.41) 1468.5,1218.5 ccw(c1468.5,1224.41) 1474.41,1224.41 1474.41,1230.31 cw(c1480.31,1230.31) 1480.31,1236.22 1482.14,1236.22 cw(c1482.14,1226.38) 1489.1,1233.34 1607.35,1115.09 cw(c1600.39,1108.13) 1610.24,1108.13 1610.24,1046.09 ccw(c1616.96,1046.09) 1612.2,1041.34 v1(1614.17,1039.37)
DRAM_A8: U4.C16 U5.P8 | length 1661
  L1 (TOP) w3.54: v1(285.43,1149.61) 294.58,1140.46 cw(c292.9,1138.78) 295.27,1138.78 ccw(c297.65,1138.78) U5.P8@295.97,1137.1 ; U5.P8@295.97,1137.1 U5.P8@299.21,1133.86 ; U4.C16@1503.94,1086.61 1491.07,1099.48 cw(c1498.03,1106.44) 1488.19,1106.44 1488.19,1117.97 cw(c1498.03,1117.97) 1491.07,1124.93 1540.42,1174.28 cw(c1547.38,1167.32) 1547.38,1177.17 v1(1620.08,1177.17)
  L4 (BOTTOM) w3.54: v1(285.43,1149.61) 285.43,1169.15 cw(c295.27,1169.15) 288.32,1176.11 328.74,1216.54 cw(c330.71,1214.57) 332.68,1216.54 ccw(c334.65,1218.5) 336.61,1216.54 344.49,1224.41 ccw(c342.52,1226.38) 344.49,1228.35 cw(c346.46,1230.31) 344.49,1232.28 352.36,1240.16 cw(c354.33,1238.19) 356.3,1240.16 ccw(c358.27,1242.13) 360.24,1240.16 368.11,1248.03 ccw(c366.14,1250) 368.11,1251.97 cw(c370.08,1253.94) 368.11,1255.91 375.07,1262.87 cw(c382.03,1255.91) 382.03,1265.75 1517.58,1265.75 cw(c1517.58,1255.91) 1524.54,1262.86 1607.35,1180.05 ccw(c1614.31,1187.01) 1614.31,1177.17 v1(1620.08,1177.17)
DRAM_A9: U4.F14 U5.P3 | length 1964.8
  L1 (TOP) w3.54: v1(277.56,1202.76) 379.78,1202.76 cw(c379.78,1192.91) 386.74,1199.87 449.14,1137.47 ccw(c456.1,1144.43) 452.99,1135.09 U5.P3@456.69,1133.86 ; U4.F14@1598.42,1023.62 1602.81,1022.16 ccw(c1605.93,1031.5) 1605.93,1021.65 1608.27,1021.65 cw(c1608.27,1012.15) 1614.99,1018.87 1621.13,1012.73 ccw(c1628.09,1019.68) 1628.09,1009.84 1694.74,1009.84 ccw(c1694.74,1019.68) 1701.7,1012.73 1705.78,1016.8 ccw(c1698.82,1023.76) 1708.66,1023.76 v1(1708.66,1131.89)
  L4 (BOTTOM) w3.54: v1(277.56,1202.76) 357.35,1282.55 cw(c364.31,1275.59) 364.31,1285.43 1551.04,1285.43 cw(c1551.04,1275.59) 1558,1282.55 v1(1708.66,1131.89)
DRAM_A10: U4.B6 U5.M2 | length 1667.6
  L1 (TOP) w3.54: U5.M2@488.19,1070.87 484.49,1069.63 ccw(c487.6,1060.29) 480.64,1067.25 473.35,1059.97 cw(c466.39,1066.93) 466.39,1057.09 458.8,1057.09 ccw(c458.8,1047.24) 451.84,1054.2 420.21,1022.57 ccw(c427.16,1015.61) 417.32,1015.61 417.32,968.64 ccw(c427.16,968.64) 420.21,961.68 448,933.89 ccw(c454.72,940.61) 454.72,931.1 cw(c454.72,921.6) 461.44,928.32 467.69,922.08 cw(c460.97,915.35) 470.47,915.35 ccw(c479.98,915.35) 473.26,908.63 479.4,902.49 ccw(c486.36,909.45) 486.36,899.61 523.48,899.61 ccw(c523.48,909.45) 530.44,902.49 v1(553.15,925.2) ; v1(1456.69,755.91) U4.B6@1472.44,771.65
  L4 (BOTTOM) w3.54: v1(553.15,925.2) 741.21,737.13 ccw(c748.17,744.09) 748.17,734.25 1098.42,734.25 cw(c1098.42,732.28) 1100.39,732.28 ccw(c1102.36,732.28) 1102.36,730.31 1110.24,730.31 ccw(c1110.24,732.28) 1112.2,732.28 cw(c1114.17,732.28) 1114.17,734.25 1122.05,734.25 cw(c1122.05,732.28) 1124.02,732.28 ccw(c1125.98,732.28) 1125.98,730.31 1133.86,730.31 ccw(c1133.86,732.28) 1135.83,732.28 cw(c1137.79,732.28) 1137.79,734.25 1141.73,734.25 ccw(c1141.73,740.16) 1147.64,740.16 1147.64,805.12 cw(c1153.54,805.12) 1153.54,811.02 cw(c1153.54,805.12) 1159.45,805.12 1159.45,740.16 ccw(c1165.35,740.16) 1165.35,734.25 ccw(c1165.35,740.16) 1171.26,740.16 1171.26,781.5 cw(c1177.16,781.5) 1177.16,787.4 cw(c1177.16,781.5) 1183.07,781.5 1183.07,740.16 ccw(c1188.98,740.16) 1188.98,734.25 ccw(c1188.98,740.16) 1194.88,740.16 1194.88,763.78 cw(c1200.79,763.78) 1200.79,769.68 cw(c1200.79,763.78) 1206.69,763.78 1206.69,740.16 ccw(c1212.6,740.16) 1212.6,734.25 cw(c1212.6,728.35) 1218.5,728.35 1218.5,722.44 ccw(c1224.41,722.44) 1224.41,716.54 ccw(c1224.41,722.44) 1230.31,722.44 1230.31,728.35 cw(c1236.22,728.35) 1236.22,734.25 1238.05,734.25 ccw(c1238.05,744.09) 1245.01,737.13 1260.9,753.02 cw(c1267.86,746.06) 1267.86,755.91 v1(1456.69,755.91)
DRAM_A11: U4.A16 U5.P7 | length 1670.4
  L1 (TOP) w3.54: U5.P7@330.71,1133.86 333.95,1130.62 cw(c332.27,1128.94) 334.65,1128.94 ccw(c337.02,1128.94) 335.34,1127.26 v1(344.49,1118.11) ; v1(1425.2,1102.36) U4.A16@1440.94,1086.61
  L4 (BOTTOM) w3.54: v1(344.49,1118.11) 337.53,1111.15 ccw(c344.49,1104.19) 334.65,1104.19 334.65,1072.97 ccw(c344.49,1072.97) 337.53,1066.01 343.57,1059.97 ccw(c350.53,1066.93) 350.53,1057.09 446.71,1057.09 ccw(c446.71,1066.93) 453.67,1059.97 493.18,1099.48 cw(c500.14,1092.52) 500.14,1102.36 1045.27,1102.36 cw(c1045.27,1100.39) 1047.24,1100.39 ccw(c1049.21,1100.39) 1049.21,1098.43 1057.09,1098.42 ccw(c1057.09,1100.39) 1059.05,1100.39 cw(c1061.02,1100.39) 1061.02,1102.36 1068.9,1102.36 cw(c1068.9,1100.39) 1070.87,1100.39 ccw(c1072.83,1100.39) 1072.83,1098.43 1080.71,1098.42 ccw(c1080.71,1100.39) 1082.68,1100.39 cw(c1084.65,1100.39) 1084.65,1102.36 1088.58,1102.36 cw(c1088.58,1096.46) 1094.49,1096.46 1094.49,1090.55 ccw(c1100.39,1090.55) 1100.39,1084.65 ccw(c1100.39,1090.55) 1106.3,1090.55 1106.3,1096.46 cw(c1112.2,1096.46) 1112.2,1102.36 cw(c1112.2,1096.46) 1118.11,1096.46 1118.11,1086.61 ccw(c1124.02,1086.61) 1124.02,1080.71 ccw(c1124.02,1086.61) 1129.92,1086.61 1129.92,1096.46 cw(c1135.83,1096.46) 1135.83,1102.36 cw(c1135.83,1096.46) 1141.73,1096.46 1141.73,1086.61 ccw(c1147.64,1086.61) 1147.64,1080.71 ccw(c1147.64,1086.61) 1153.54,1086.61 1153.54,1096.46 cw(c1159.45,1096.46) 1159.45,1102.36 cw(c1159.45,1096.46) 1165.35,1096.46 1165.35,1086.61 ccw(c1171.26,1086.61) 1171.26,1080.71 ccw(c1171.26,1086.61) 1177.16,1086.61 1177.16,1096.46 cw(c1183.07,1096.46) 1183.07,1102.36 cw(c1183.07,1096.46) 1188.98,1096.46 1188.98,1086.61 ccw(c1194.88,1086.61) 1194.88,1080.71 ccw(c1194.88,1086.61) 1200.79,1086.61 1200.79,1096.46 cw(c1206.69,1096.46) 1206.69,1102.36 cw(c1206.69,1096.46) 1212.6,1096.46 1212.6,1086.61 ccw(c1218.5,1086.61) 1218.5,1080.71 ccw(c1218.5,1086.61) 1224.41,1086.61 1224.41,1096.46 cw(c1230.31,1096.46) 1230.31,1102.36 cw(c1230.31,1096.46) 1236.22,1096.46 1236.22,1086.61 ccw(c1242.13,1086.61) 1242.13,1080.71 ccw(c1242.13,1086.61) 1248.03,1086.61 1248.03,1096.46 cw(c1253.94,1096.46) 1253.94,1102.36 cw(c1253.94,1096.46) 1259.84,1096.46 1259.84,1086.61 ccw(c1265.75,1086.61) 1265.75,1080.71 ccw(c1265.75,1086.61) 1271.65,1086.61 1271.65,1096.46 cw(c1277.56,1096.46) 1277.56,1102.36 cw(c1277.56,1096.46) 1283.46,1096.46 1283.46,1086.61 ccw(c1289.37,1086.61) 1289.37,1080.71 ccw(c1289.37,1086.61) 1295.27,1086.61 1295.27,1096.46 cw(c1301.18,1096.46) 1301.18,1102.36 cw(c1301.18,1096.46) 1307.09,1096.46 1307.09,1086.61 ccw(c1312.99,1086.61) 1312.99,1080.71 ccw(c1312.99,1086.61) 1318.9,1086.61 1318.9,1096.46 cw(c1324.8,1096.46) 1324.8,1102.36 cw(c1324.8,1096.46) 1330.71,1096.46 1330.71,1086.61 ccw(c1336.61,1086.61) 1336.61,1080.71 ccw(c1336.61,1086.61) 1342.52,1086.61 1342.52,1096.46 cw(c1348.42,1096.46) 1348.42,1102.36 cw(c1348.42,1096.46) 1354.33,1096.46 1354.33,1086.61 ccw(c1360.24,1086.61) 1360.24,1080.71 ccw(c1360.24,1086.61) 1366.14,1086.61 1366.14,1096.46 cw(c1372.05,1096.46) 1372.05,1102.36 cw(c1372.05,1096.46) 1377.95,1096.46 1377.95,1086.61 ccw(c1383.86,1086.61) 1383.86,1080.71 ccw(c1383.86,1086.61) 1389.76,1086.61 1389.76,1096.46 cw(c1395.67,1096.46) 1395.67,1102.36 cw(c1395.67,1096.46) 1401.57,1096.46 1401.57,1088.58 ccw(c1407.48,1088.58) 1407.48,1082.68 ccw(c1407.48,1088.58) 1413.39,1088.58 1413.39,1096.46 cw(c1419.29,1096.46) 1419.29,1102.36 v1(1425.2,1102.36)
DRAM_A12: U4.C15 U5.R2 | length 1209
  L1 (TOP) w3.54: v1(474.41,1149.61) 483.56,1158.75 ccw(c481.88,1160.43) 484.25,1160.43 cw(c486.63,1160.43) 484.95,1162.11 U5.R2@488.19,1165.35 ; v1(1488.19,1070.87) U4.C15@1503.94,1055.12
  L4 (BOTTOM) w3.54: v1(474.41,1149.61) 485.31,1160.5 cw(c492.27,1153.54) 492.27,1163.39 515.75,1163.39 cw(c515.75,1157.48) 521.65,1157.48 ccw(c527.56,1157.48) 527.56,1151.57 ccw(c527.56,1157.48) 533.46,1157.48 cw(c539.37,1157.48) 539.37,1163.39 541.34,1163.39 ccw(c541.34,1167.32) 545.27,1167.32 cw(c549.21,1167.32) 549.21,1171.26 553.15,1171.26 cw(c553.15,1167.32) 557.09,1167.32 ccw(c561.02,1167.32) 561.02,1163.39 562.99,1163.39 cw(c562.99,1157.48) 568.9,1157.48 568.9,1155.51 ccw(c574.8,1155.51) 574.8,1149.61 ccw(c574.8,1155.51) 580.71,1155.51 580.71,1157.48 cw(c586.61,1157.48) 586.61,1163.39 cw(c586.61,1157.48) 592.52,1157.48 ccw(c598.42,1157.48) 598.42,1151.57 ccw(c598.42,1157.48) 604.33,1157.48 cw(c610.24,1157.48) 610.24,1163.39 612.06,1163.39 ccw(c612.06,1173.23) 619.02,1166.27 621.13,1168.38 cw(c628.09,1161.42) 628.09,1171.26 1432.25,1171.26 cw(c1432.25,1164.54) 1437.01,1169.29 ccw(c1441.76,1174.04) 1441.76,1167.32 1456.55,1167.32 cw(c1456.55,1157.48) 1463.51,1164.44 1481.37,1146.58 cw(c1474.41,1139.62) 1484.25,1139.62 1484.25,1128.09 cw(c1474.41,1128.09) 1481.37,1121.13 1473.35,1113.12 ccw(c1480.31,1106.16) 1470.47,1106.16 1470.47,1092.66 ccw(c1480.31,1092.66) 1473.35,1085.7 v1(1488.19,1070.87)
DRAM_A13: U4.D15 U5.R8 | length 1974
  L1 (TOP) w3.54: U5.R8@299.21,1165.35 302.45,1168.6 cw(c304.13,1166.91) 304.13,1169.29 ccw(c304.13,1171.67) 305.81,1169.99 v1(314.96,1179.13) ; v1(1519.68,1070.87) U4.D15@1535.43,1055.12
  L4 (BOTTOM) w3.54: v1(314.96,1179.13) 388.85,1253.02 cw(c395.81,1246.06) 395.81,1255.91 1513.64,1255.91 cw(c1513.64,1246.06) 1520.6,1253.02 1654.6,1119.02 ccw(c1661.56,1125.98) 1661.56,1116.14 1694.74,1116.14 cw(c1694.74,1106.3) 1701.7,1113.26 1713.65,1101.31 cw(c1706.69,1094.35) 1716.53,1094.35 1716.53,1074.94 ccw(c1726.38,1074.94) 1719.42,1067.98 1731.37,1056.03 cw(c1724.41,1049.07) 1734.25,1049.07 1734.25,1017.86 cw(c1724.41,1017.86) 1731.37,1010.9 1731.23,1010.76 cw(c1724.27,1017.72) 1724.27,1007.87 1700.93,1007.87 ccw(c1700.93,998.03) 1693.97,1004.99 1685.95,996.98 ccw(c1692.91,990.02) 1683.07,990.02 1683.07,964.71 cw(c1673.23,964.71) 1680.19,957.75 1680.05,957.61 cw(c1673.09,964.57) 1673.09,954.72 1571.01,954.72 cw(c1571.01,964.57) 1564.05,957.61 1563.91,957.75 cw(c1570.87,964.71) 1561.02,964.71 1561.02,986.08 ccw(c1551.18,986.08) 1558.14,993.04 1522.57,1028.61 cw(c1529.53,1035.57) 1519.68,1035.57 v1(1519.68,1070.87)